# Altium PCB MB_v3.PcbDoc (part 10 of 11)
Units mm, origin at the board's own origin, x right, y up, seen from the top; angles counter-clockwise.
Board outline 203 x 72 mm, 6 copper layers (Top Layer, Layer 3, Layer 1, Layer 2, Layer 4, Bottom Layer), stack 1.52 mm thick; 726 components, 608 nets, 3144 pads, 2508 vias.
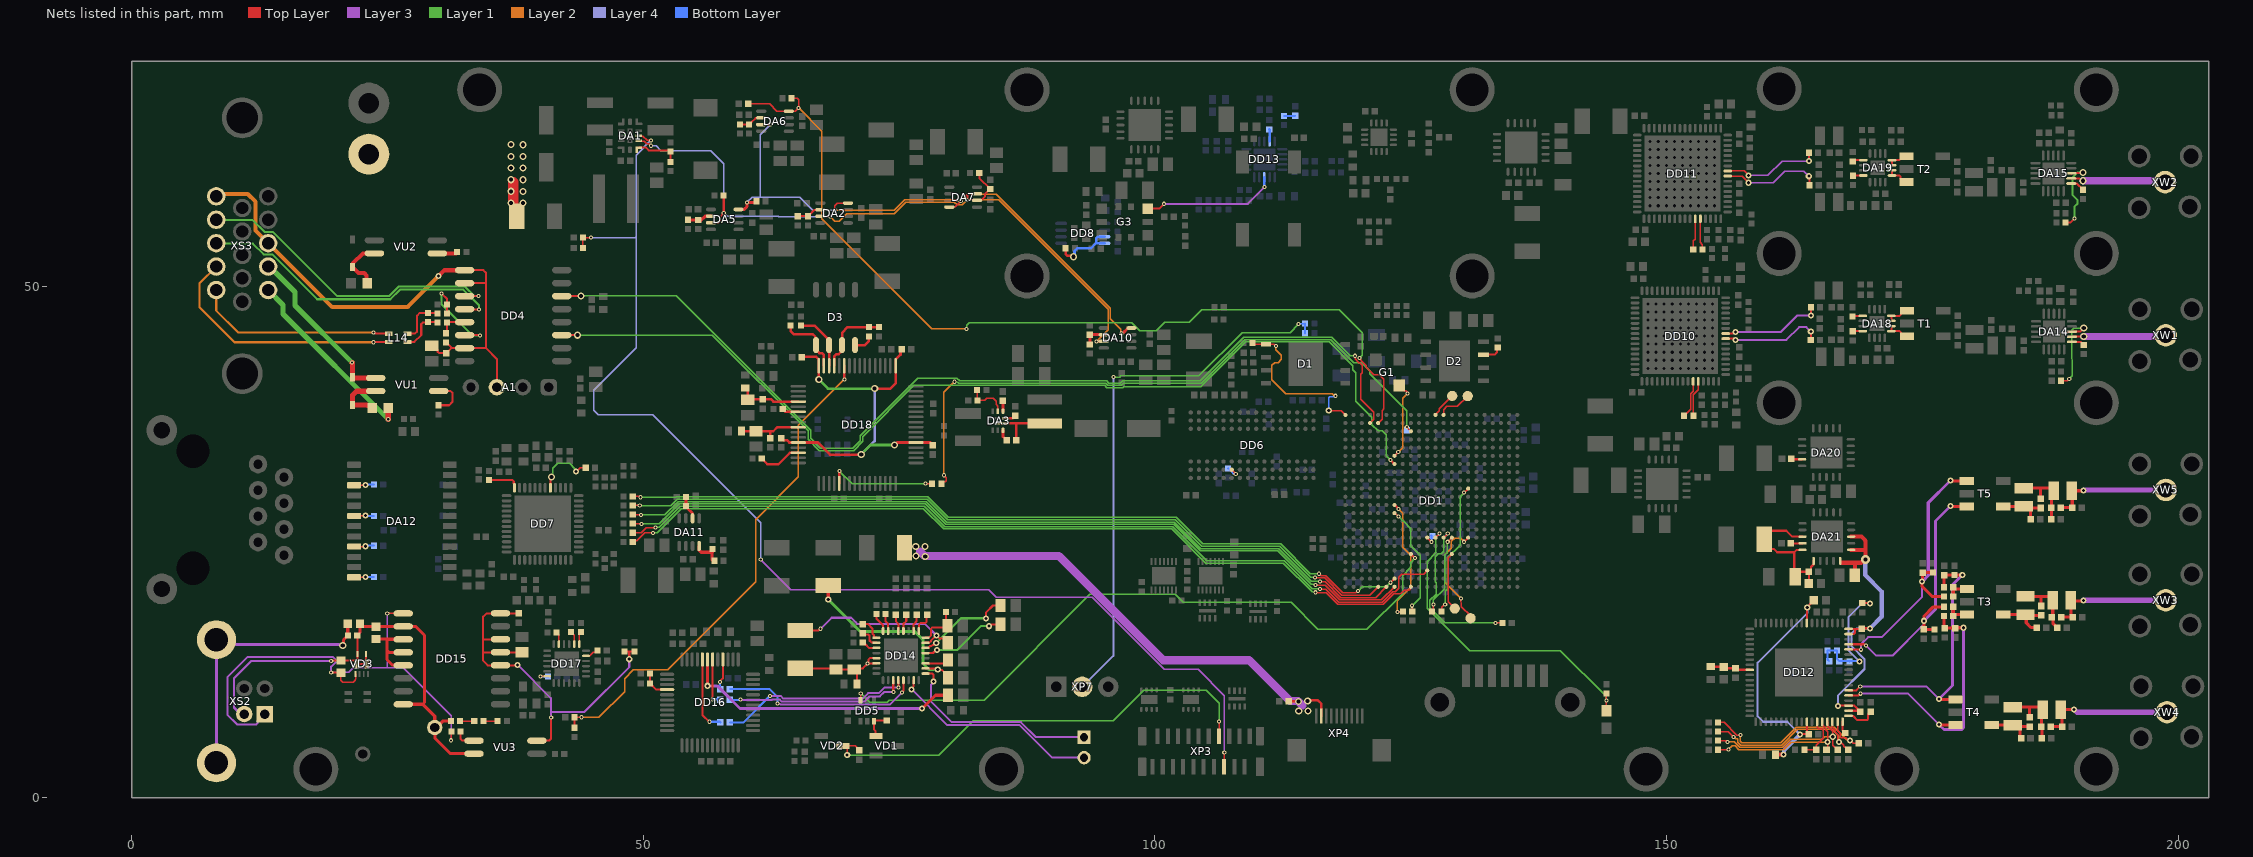
[diagram p12: the nets of this part, all layers, seen from the top]

## Via types
v1: diameter 0.8, hole 0.4, Top Layer to Bottom Layer, tented both sides, 1056 vias
v2: diameter 0.4, hole 0.2, Top Layer to Bottom Layer, tented both sides, 707 vias
v3: diameter 0.6, hole 0.3, Top Layer to Bottom Layer, tented both sides, 364 vias
v4: diameter 0.7, hole 0.4, Top Layer to Bottom Layer, tented both sides, 223 vias
v5: diameter 0.8, hole 0.4, Top Layer to Bottom Layer, 52 vias
v6: diameter 0.9, hole 0.5, Top Layer to Bottom Layer, 45 vias
v7: diameter 0.66, hole 0.4, Top Layer to Bottom Layer, 25 vias
v8: diameter 0.7, hole 0.3, Top Layer to Bottom Layer, 13 vias
v9: diameter 0.5, hole 0.2, Top Layer to Bottom Layer, 12 vias
v10: diameter 0.5, hole 0.3, Top Layer to Bottom Layer, 5 vias
v11: diameter 1, hole 0.5, Top Layer to Bottom Layer, 2 vias
v12: diameter 0.4, hole 0.2, Top Layer to Bottom Layer, 2 vias
v13: diameter 0.9, hole 0.4, Top Layer to Bottom Layer, tented both sides, 2 vias

## Nets (pads, with @x,y where several pads share a name; then routed paths per layer and width w, separated by ;. In a path a pad name is that pad's centre, name@x,y a point inside that pad or via, vN(x,y) a via of type N, cw(c..) or ccw(c..) an arc to the next point about the centre after c; other vN are vias at no path point) (continued)
NetC273_2: C273.2 C275.2 R137.1 R138.1 R144.1 R145.1 | length 13.3
  Top Layer w0.2: R145.1@169.125,19.025 169.825,19.025 v3@169.85,19.05
  Layer 4 w0.2: v3(168.839,13.336) 167.785,14.39 167.785,17.685 169.125,19.025 169.844,19.025 v3(169.864,19.004)
  Bottom Layer w0.2: C273.2@165.878,13.367 165.725,13.521 R138.1@165.725,14.4 R137.1@166.65,14.4 166.65,13.605 C275.2@166.887,13.367 167.843,13.367 R144.1@167.878,13.332 167.921,13.375 v3@168.8,13.375
NetC274_2: C274.2 C276.2 DD12.8 DD12.47 L46.2 | length 25.6
  Top Layer w0.2: v3@163.002,6.223 C276.2@163.896,6.223 163.71,6.409 DD12.47@163.71,7.434 ; DD12.8@163.71,17.084 163.71,18.623 164.066,18.979 164.091,18.979 164.391,19.279 C274.2@164.391,19.329
  Top Layer w0.4: L46.2@160.635,4.225 v3(161.43,4.225)
  Layer 4 w0.2: v3(163.039,6.186) 161.791,7.434 159.441,7.434 158.9,7.975 158.9,13.2 163.749,18.049 v3(163.749,18.584)
  Layer 4 w0.4: v3(161.43,4.225) 161.468,4.263 161.468,4.615 v3(163.039,6.186)
NetC277_2: C277.2 DD12.49 R143.2 | length 4.6
  Top Layer w0.125: R143.2@163.467,4.699 163.469,4.697 C277.2@164.61,4.697 164.629,4.716 164.629,5.131 165.324,5.825 165.324,6.621 165.213,6.731 164.864,6.731 164.71,6.885 DD12.49@164.71,7.434
NetC278_2: C278.2 DA20.14 | length 1.1
  Top Layer w0.2: C278.2@162.197,33.147 162.255,33.089 DA20.14@163.251,33.089
NetC279_2: C279.2 DD12.50 R142.2 | length 14.3
  Top Layer w0.125: R142.2@155.027,4.699 156.024,4.699 v2(156.05,4.725) ; DD12.50@165.21,7.434 165.21,7.134 165.574,6.77 165.574,6.656 165.749,6.481 165.749,5.448 v3(165.741,5.44) 165.741,4.812 C279.2@165.626,4.697
  Layer 2 w0.125: v2(156.05,4.725) 156.4,5.075 156.695,5.075 157.071,4.7 161.434,4.7 162.174,5.44 v3(165.741,5.44)
NetC281_2: C281.2 DD12.51 R141.2 | length 15.1
  Top Layer w0.125: R141.2@155.027,5.588 155.763,5.588 155.876,5.475 v2(155.95,5.475) ; DD12.51@165.71,7.434 165.734,7.41 165.734,7.004 166.237,6.501 v3(166.237,5.969) 166.261,5.945 166.261,5.159 C281.2@166.723,4.697
  Layer 2 w0.125: v2(155.95,5.475) 156.614,5.475 157.164,4.925 161.341,4.925 162.139,5.723 165.222,5.723 165.467,5.969 v3(166.237,5.969)
NetC283_2: C283.2 DD12.52 R140.2 | length 17.5
  Top Layer w0.125: R140.2@155.027,6.477 156.01,6.477 v2(156.531,5.956) ; DD12.52@166.21,7.434 166.21,6.882 166.487,6.605 166.487,6.408 166.724,6.171 166.724,5.753 166.747,5.73 166.747,5.624 167.019,5.351 167.128,5.351 167.333,5.146 167.333,5.028 167.406,4.955 167.482,4.955 C283.2@167.739,4.697
  Layer 2 w0.125: v2(156.531,5.956) 156.606,5.956 156.778,5.784 156.891,5.784 156.964,5.711 156.964,5.443 157.257,5.15 161.247,5.15 162.782,6.684 166.176,6.684 166.838,6.022 v3(166.838,5.442)
NetC284_2: C284.2 C288.2 C291.2 DA21.13 DA21.15 DA21.16 L47.2 | length 15.4
  Top Layer w0.2: DA21.15@163.289,24.227 162.702,24.227 162.475,24 ; DA21.13@163.289,25.527 162.273,25.527 161.7,26.1 160.18,26.1 159.53,25.45 159.53,24.99 160.18,24.34 160.463,24.34 160.803,24 162.475,24 ; C288.2@163.9,20.95 163.913,20.963 C291.2@163.913,22.093 ; DA21.16@164.364,23.152 164.354,23.142 164.354,22.804 164.11,22.56 164.11,22.29 C291.2@163.913,22.093 ; 162.475,24 162.475,21.7 C284.2@162.575,21.6 162.575,21.618 163.05,22.093 C291.2@163.913,22.093
NetC286_2: C286.2 C289.2 DD12.27 L48.2 | length 3.9
  Top Layer w0.25: L48.2@154.323,12.822 154.353,12.792 C286.2@155.593,12.792 155.733,12.652 C289.2@156.736,12.652 156.879,12.509 DD12.27@158.135,12.509
NetC287_2: C287.2 DD12.53 R139.2 | length 18.9
  Top Layer w0.125: R139.2@155.027,7.366 155.634,7.366 156.875,6.125 v2(157.225,6.125) ; DD12.53@166.71,7.434 166.71,6.82 166.737,6.793 166.737,6.536 166.974,6.298 166.974,5.972 167.084,5.862 167.509,5.862 167.783,5.588 167.969,5.588 168.223,5.334 C287.2@168.77,5.334
  Layer 2 w0.125: v2(157.225,6.125) 157.189,6.089 157.189,5.536 157.35,5.375 161.154,5.375 162.688,6.909 166.364,6.909 167.594,5.679 167.821,5.679 v3(167.912,5.588)
NetC290_2: C290.2 DD12.55 | length 2.9
  Top Layer w0.2: DD12.55@167.785,8.009 167.795,7.999 168.251,7.999 168.65,7.6 169.583,7.6 169.7,7.717 169.7,8.093 169.724,8.117 169.724,8.21 C290.2@169.944,8.43
NetC292_2: C292.2 DA21.14 | length 1.1
  Top Layer w0.2: C292.2@162.149,24.892 162.164,24.877 DA21.14@163.289,24.877
NetC293_2: C293.2 C294.2 C295.2 DA21.1 DA21.3 DA21.20 DD12.56 DD12.57 DD12.71 DD12.72 | length 34.1
  Top Layer w0.2: v3@166.741,9.009 DD12.57@167.785,9.009 168.346,9.009 168.525,8.83 168.528,8.83 C295.2@168.849,8.509 ; DA21.20@166.964,23.152 166.964,22.998 166.987,22.975 DA21.20@167.039,22.975 ; DD12.56@167.785,8.509 C295.2@168.849,8.509 ; DD12.71@167.785,16.009 DD12.71@167.785,16.009 168.285,16.01 168.404,16.129 168.404,16.509 ; DD12.72@167.785,16.509 168.404,16.509 ; C295.2@168.928,8.43 C295.2@168.849,8.509 ; v3@169.825,16.575 169.089,16.575 C294.2@169.055,16.541 169.023,16.509 168.404,16.509
  Top Layer w0.4: DA21.20@167.039,22.975 168.25,22.975 ; DA21.1@168.039,24.227 169.45,24.227 ; DA21.3@168.039,25.527 169.048,25.527 169.249,25.325 169.45,25.125 169.45,24.227 ; C293.2@168.4,21.75 168.4,22.825 168.25,22.975 ; 168.25,22.975 168.99,22.975 169.315,23.3 v13(169.45,23.3) 169.45,24.227
  Layer 4 w0.2: v3(166.764,8.986) 166.764,10.014 169.339,12.589 169.339,13.543 168.085,14.797 168.085,16.06 168.561,16.536 v3(169.864,16.536)
  Layer 4 w0.4: v13(169.45,23.3) 169.414,23.264 169.414,21.786 171.025,20.175 171.025,17.697 v3(169.864,16.536)
NetC296_2: C296.2 DD12.68 R147.1 R157.2 T5.3 | length 28.8
  Top Layer w0.2: DD12.68@167.785,14.509 168.966,14.509 v2(169,14.475)
  Top Layer w0.3: R147.1@176.04,22.029 176.03,22.019 C296.2@175.024,22.019 175.024,21.174 v3(174.975,21.125) 174.975,20.65 175.94,19.685 R157.2@177.114,19.685 ; v3@177.7,30.975 177.707,30.968 T5.3@179.35,30.968
  Layer 3 w0.2: v2(169,14.475) 169,14.991 169.709,15.7 171.025,15.7 174.975,19.65 v3(174.975,21.125)
  Layer 3 w0.3: v3(174.975,21.125) 175.575,21.725 175.575,28.85 v3(177.741,31.016)
NetC298_2: C298.2 DD12.69 R148.1 R153.2 T5.1 | length 28
  Top Layer w0.2: DD12.69@167.785,15.009 169.312,15.009 169.421,14.9 v2(169.475,14.9)
  Top Layer w0.3: R148.1@176.167,16.452 175.161,16.452 C298.2@175.151,16.462 v3(175.15,17.3) v3(175.15,17.3) 175.155,17.305 175.155,17.755 176.069,18.669 R153.2@177.114,18.669 ; v3@177.707,28.468 T5.1@179.35,28.468
  Layer 3 w0.2: v2(169.475,14.9) 170.475,13.9 172.075,13.9 175.088,16.913 175.088,17.238 v3(175.15,17.3)
  Layer 3 w0.3: v3(175.15,17.3) 176.275,18.425 176.275,27.05 v3(177.741,28.516)
NetC300_1: C300.1 DA3.1 | length 1
  Top Layer w0.25: C300.1@85.125,38.79 85.15,38.765 DA3.1@85.15,37.775
NetC301_2: C301.2 DD12.60 R149.1 R154.2 T4.3 | length 27.2
  Top Layer w0.2: DD12.60@167.785,10.509 168.534,10.509 v2(168.925,10.9)
  Top Layer w0.3: v3@176.597,9.606 T4.3@178.24,9.606 ; R154.2@177.114,20.574 177.114,21.742 C301.2@177.137,21.765 177.147,21.775 R149.1@178.153,21.775 v3(178.9,21.775)
  Layer 3 w0.2: v2(168.925,10.9) 175.385,10.9 v3(176.631,9.654)
  Layer 3 w0.3: v3(176.631,9.654) 177.95,10.973 177.95,20.825 v3(178.9,21.775)
NetC302_1: C302.1 DA3.9 | length 1.1
  Top Layer w0.25: DA3.9@85.325,37.1 86.11,37.1 C302.1@86.35,37.34
NetC303_2: C303.2 DD12.59 R150.1 R152.2 T4.1 | length 27.3
  Top Layer w0.2: DD12.59@167.785,10.009 168.733,10.009 168.899,10.175 v2(168.95,10.175)
  Top Layer w0.3: v3@176.597,7.106 T4.1@178.24,7.106 ; R152.2@177.114,17.78 177.114,16.648 R150.1@177.183,16.579 178.189,16.579 C303.2@178.199,16.589 178.235,16.625 v3(179.025,16.625)
  Layer 3 w0.2: v2(168.95,10.175) 173.61,10.175 v3(176.631,7.154)
  Layer 3 w0.3: v3(176.631,7.154) 177.102,6.683 178.849,6.683 179.025,6.859 v3(179.025,16.625)
NetC304_1: C304.1 DA3.7 | length 1.2
  Top Layer w0.25: DA3.7@85.15,35.925 85.15,35.29 C304.1@85.515,34.925
NetC304_2: C304.2 DA3.8 L67.1 | length 6
  Top Layer w0.25: DA3.8@84.95,36.6 86.45,36.6 ; C304.2@86.435,34.925 86.45,34.94 86.45,36.6 ; L67.1@89.225,36.565 89.19,36.6 86.45,36.6
NetC306_2: C306.2 C307.2 L50.1 T3.5 | length 5.6
  Top Layer w0.3: T3.5@182.898,17.907 L50.1@185.072,17.907 ; C306.2@186.184,16.637 186.171,16.65 185.6,16.65 185.151,17.099 185.151,17.828 C307.2@186.596,17.828
NetC307_1: C307.1 C314.2 C315.2 L50.2 L53.1 | length 6.7
  Top Layer w0.3: L50.2@185.072,19.687 186.65,19.687 ; C307.1@186.596,18.748 186.596,19.633 186.65,19.687 ; C314.2@188.168,16.637 187.744,17.061 187.744,17.569 C315.2@187.66,17.653 187.738,17.731 L53.1@187.738,19.304 187.738,19.327 187.378,19.687 186.65,19.687
NetC308_2: C308.2 C312.2 L51.1 T4.5 | length 4.8
  Top Layer w0.3: T4.5@181.78,7.106 183.814,7.106 L51.1@183.835,7.085 ; L51.1@184.193,6.959 C312.2@185.486,6.959 ; L51.1@184.193,7.085 184.553,6.725 184.553,5.908 C308.2@184.645,5.816
NetC309_2: C309.2 C313.2 L52.1 T5.5 | length 5.5
  Top Layer w0.3: T5.5@182.89,28.468 184.882,28.468 L52.1@184.899,28.485 ; C309.2@185.582,27.215 185.582,28.125 185.222,28.485 L52.1@184.899,28.485 ; C313.2@186.55,28.327 185.057,28.327 L52.1@184.899,28.485
NetC311_2: C311.2 L68.2 XP4.2 | length 47.3
  Top Layer w0.25: C311.2@113.085,9.425 v4(114.025,9.425) ; v4(114.925,9.45) 115,9.525 115.926,9.525 116.25,9.201 XP4.2@116.25,8
  Layer 3 w0.8: 77.037,24.088 77.48,23.645 90.605,23.645 100.8,13.45 109.2,13.45 113.188,9.462 113.987,9.462 114.425,9.025
  other v4: 114.95,8.475 114.05,8.5 77.55,23.6 76.65,23.625 76.625,24.55 77.525,24.575
NetC312_1: C312.1 C316.2 C318.2 L51.2 L54.1 | length 6.8
  Top Layer w0.3: L51.2@183.835,8.865 185.475,8.865 ; C312.1@185.486,7.879 185.486,8.854 185.475,8.865 ; C316.2@186.677,5.816 186.677,6.911 C318.2@186.629,6.959 186.629,8.736 186.5,8.865 185.475,8.865
NetC313_1: C313.1 C317.2 C319.2 L52.2 L55.1 | length 7
  Top Layer w0.3: L52.2@184.899,30.265 186.475,30.265 ; C313.1@186.55,29.247 186.55,30.19 186.475,30.265 ; C317.2@187.614,27.215 C319.2@187.614,28.358 187.614,29.803 L55.1@187.82,30.009 187.564,30.265 186.475,30.265
NetC315_1: C315.1 C320.2 L53.2 XW3.1 | length 12
  Top Layer w0.3: C315.1@188.58,17.653 C320.2@189.692,17.653 189.518,17.827 L53.2@189.518,19.304 ; L53.2@189.587,19.227 v3@190.696,19.227
  Layer 3 w0.5: v3@190.773,19.304 XW3.1@198.78,19.304
  other v3: 190.737,19.268
NetC318_1: C318.1 C321.2 L54.2 XW4.1 | length 13.3
  Top Layer w0.3: C318.1@187.549,6.959 C321.2@188.661,6.959 L54.2@188.661,8.292 ; L54.2@188.535,8.292 188.893,8.65 v3(189.8,8.65) ; L54.2@188.535,8.61 L54.2@188.661,8.484
  Layer 3 w0.5: v3(189.8,8.65) 189.827,8.65 190.108,8.369 XW4.1@198.905,8.369
NetC319_1: C319.1 C322.2 L55.2 XW5.1 | length 12
  Top Layer w0.3: C319.1@188.534,28.358 C322.2@189.646,28.358 189.646,29.963 L55.2@189.6,30.009 190.709,30.009 v3(190.75,30.05)
  Layer 3 w0.3: v3(190.75,30.05) v3@190.786,30.086
  Layer 3 w0.5: v3@190.786,30.086 XW5.1@198.793,30.086
NetC324_1: C324.1 R197.1 | length 1.1
  Bottom Layer w0.2: R197.1@112.6,66.65 C324.1@113.7,66.65
NetC325_2: C325.2 C338.1 DD18.4 L70.1 | length 6.4
  Top Layer w0.25: L70.1@59.95,40.07 59.98,40.07 60.2,39.85 C338.1@60.2,38.9 60.26,38.96 C325.2@61.65,38.96 62.49,38.96 62.725,38.725 DD18.4@65.15,38.725
NetC326_1: C326.1 C328.2 C329.2 C330.2 DD18.12 DD18.37 DD18.49 DD18.64 | length 38.5
  Top Layer w0.25: C330.2@63.5,35.16 63.695,34.965 64.035,34.965 64.275,34.725 DD18.12@65.15,34.725 67.066,34.725 68.241,33.55 v4@71.3,33.55 ; C329.2@65.485,43.05 65.535,43.1 66.9,43.1 67.15,42.85 DD18.64@67.15,42.225 v4(67.15,40.875) ; v4@72.6,40 74.15,40 74.65,40.5 DD18.49@74.65,42.225 74.65,42.85 74.664,42.85 75.134,43.32 75.134,43.709 C328.2@75.275,43.85 ; v4@74.55,34.475 74.8,34.725 DD18.37@76.65,34.725 78.05,34.725 C326.1@78.3,34.475
  Layer 1 w0.25: v4(67.15,40.875) 68.034,39.991 v4(72.612,39.991) ; v4(71.295,33.551) 72.223,34.479 v4(74.547,34.479)
  Layer 4 w0.25: v4(71.295,33.551) 72.612,34.868 v4(72.612,39.991)
NetC327_2: C327.2 C346.2 DD15.12 DD15.13 DD15.14 DD15.16 R170.1 R172.1 VU3.4 | length 39
  Top Layer w0.2: DD15.14@36.043,15.494 34.35,15.494 ; v3@37.725,12.975 37.704,12.954 DD15.12@36.043,12.954 34.796,12.954 34.35,13.4 34.35,14.175 ; C346.2@37.825,18.02 37.811,18.034 DD15.16@36.043,18.034 34.684,18.034 34.35,17.7 34.35,15.494 ; C327.2@38.15,14.225 38.149,14.224 DD15.13@36.043,14.224 34.399,14.224 34.35,14.175 ; VU3.4@39.6,5.585 40.785,5.585 41,5.8 v2(41,7.85) ; R172.1@48.15,14.3 48.65,14.3 ; v3(48.625,13.55) 48.625,14.275 48.65,14.3 ; R170.1@49.15,14.3 48.65,14.3 ; 34.35,14.175 34.35,15.494
  Layer 3 w0.2: v3(37.71,12.99) 40.95,9.75 ; v2(41,7.85) 41,8.4 ; 41,9.75 41,8.4 ; v3(48.625,13.55) 48.625,12.775 44.25,8.4 41,8.4
NetC331_1: C331.1 DD16.30 | length 4.7
  Top Layer w0.2: v2@56.775,9.625 DD16.30@56.775,13.525
  Bottom Layer w0.2: v2(56.775,9.636) 57.479,9.636 C331.1@57.54,9.575
NetC331_2: C331.2 DD14.19 | length 17.7
  Top Layer w0.2: DD14.19@74.425,11.5 74.425,10.35 v2(74.45,10.325)
  Layer 3 w0.2: v2(59.506,9.593) 59.538,9.561 62.541,9.561 62.58,9.6 63.351,9.6 63.551,9.4 71.575,9.4 72.1,9.925 73.124,9.925 73.524,10.325 v2(74.45,10.325)
  Bottom Layer w0.2: C331.2@58.46,9.575 59.525,9.575 v2@59.55,9.55
NetC332_1: C332.1 DD16.32 | length 7.5
  Top Layer w0.2: DD16.32@55.775,13.525 55.775,8.1 v2@56.45,7.425
  Bottom Layer w0.2: v2(56.45,7.436) 57.479,7.436 C332.1@57.54,7.375
NetC332_2: C332.2 DD14.20 | length 18.8
  Top Layer w0.2: v2(74.925,10.8) DD14.20@74.925,11.5
  Layer 3 w0.2: v2(62.375,9.961) 63.414,9.961 63.675,9.7 71.451,9.7 71.976,10.225 73,10.225 73.575,10.8 v2(74.925,10.8)
  Bottom Layer w0.2: C332.2@58.46,7.375 59.8,7.375 v2@62.375,9.95
NetC333_2: C333.2 C337.1 DD18.9 L69.1 | length 6.4
  Top Layer w0.25: L69.1@59.6,35.85 59.625,35.825 C337.1@61.02,35.825 62.375,35.825 ; C333.2@62.425,35.16 62.425,35.775 62.375,35.825 ; DD18.9@65.15,36.225 63.1,36.225 62.7,35.825 62.375,35.825
NetC334_1: C334.1 DD16.28 | length 3.1
  Top Layer w0.2: v2(57.475,11.325) 57.475,11.379 57.775,11.679 DD16.28@57.775,13.525
  Bottom Layer w0.2: v2(57.475,11.325) 57.475,10.69 C334.1@57.54,10.625
NetC334_2: C334.2 DD14.21 | length 19.6
  Top Layer w0.2: v2(75.3,10.3) 75.3,10.354 75.425,10.479 DD14.21@75.425,11.5
  Layer 3 w0.2: v2(63.1,9.2) 63.138,9.162 63.365,9.162 63.426,9.1 74.1,9.1 v2(75.3,10.3)
  Bottom Layer w0.2: C334.2@58.46,10.625 62.35,10.625 63.1,9.875 v2(63.1,9.2)
NetC341_2: C341.2 DD14.1 | length 2.2
  Top Layer w0.2: DD14.1@76.925,16.3 76.925,16.9 77.125,17.1 77.573,17.1 77.69,17.217 77.69,17.867 C341.2@77.728,17.905
NetC342_2: C342.2 DD14.2 | length 1.7
  Top Layer w0.2: DD14.2@76.425,16.3 76.425,16.975 76.702,17.252 C342.2@76.702,17.895
NetC344_2: C344.2 DD14.4 | length 1.7
  Top Layer w0.2: DD14.4@75.425,16.3 75.425,17 75.696,17.271 C344.2@75.696,17.905
NetC345_2: C345.2 DD14.5 | length 1.7
  Top Layer w0.2: C345.2@74.68,17.905 74.675,17.9 74.675,17.25 74.925,17 DD14.5@74.925,16.3
NetC347_1: C347.1 C348.1 DD14.13 DD14.14 L60.2 L61.1 | length 10.4
  Top Layer w0.2: L61.1@65.35,12.65 68.723,12.65 C348.1@68.838,12.535 C347.1@70.616,12.535 ; L60.2@70.865,11.126 70.865,12.514 70.73,12.649 71.449,12.649 v2(71.925,13.125) ; DD14.14@72.775,13.15 71.95,13.15 v2(71.925,13.125) ; DD14.13@72.775,13.65 72.142,13.65 72.025,13.533 72.025,13.279 71.925,13.179 v2(71.925,13.125)
NetC349_1: C349.1 C352.1 C357.2 C358.1 DD15.2 DD15.8 R175.2 R178.2 VD3.5 VU3.2 XS2.4 | length 48.8
  Top Layer w0.2: v2(19.5,13.375) 19.554,13.375 19.606,13.427 C358.1@20.447,13.427 21.658,13.427 21.684,13.401 21.879,13.401 22.004,13.276 VD3.5@22.004,13.081 ; R178.2@22.04,15.875 22.079,15.836 VD3.5@22.079,14.056 22.079,13.156 VD3.5@22.004,13.081 ; VD3.5@22.879,14.056 22.879,13.156 VD3.5@22.954,13.081 VD3.5@22.004,13.081
  Top Layer w0.3: R178.2@22.04,15.875 22.317,16.152 C357.2@22.317,17.018 ; C357.2@22.317,16.993 22.567,16.743 22.725,16.743 22.743,16.725 C349.1@23.875,16.725 26.504,16.725 DD15.2@26.543,16.764 27.736,16.764 28.623,15.877 28.623,9.32 28.447,9.144 ; DD15.8@26.543,9.144 28.447,9.144 ; R175.2@31.189,7.5 30.393,7.5 29.768,6.875 C352.1@29.617,6.875 ; VU3.2@33.45,4.315 31.16,4.315 29.624,5.851 29.624,6.868 C352.1@29.617,6.875 ; 28.447,9.144 29.617,7.974 C352.1@29.617,6.875
  Layer 3 w0.2: XS2.4@10.997,8.183 10.642,8.183 9.997,8.828 9.997,11.697 11.675,13.375 v2(19.5,13.375)
NetC349_2: C349.2 DD15.3 DD15.4 DD15.5 | length 8.2
  Top Layer w0.3: C349.2@23.875,15.525 24.95,15.525 ; DD15.5@26.543,12.954 26.511,12.986 25.464,12.986 24.95,13.5 24.95,14.412 ; DD15.4@26.543,14.224 25.138,14.224 24.95,14.412 ; DD15.3@26.543,15.494 26.537,15.5 25.126,15.5 25.101,15.525 24.95,15.525 ; 24.95,14.412 24.95,15.525
NetC350_1: C350.1 DD14.27 | length 2.3
  Top Layer w0.2: DD14.27@77.575,13.15 79.458,13.15 C350.1@79.769,13.462
NetC351_1: C351.1 DD14.32 R171.1 | length 4.4
  Top Layer w0.2: DD14.32@77.575,15.65 77.585,15.66 77.91,15.66 78.1,15.85 78.1,16.508 78.217,16.625 79.525,16.625 C351.1@79.725,16.825 79.575,16.975 R171.1@79.575,18.175
NetC353_1: C353.1 DD14.31 L61.2 | length 17.1
  Top Layer w0.2: L61.2@65.35,16.35 67.108,16.35 67.283,16.525 v2(67.325,16.525) ; DD14.31@77.575,15.15 77.585,15.16 77.962,15.16 78.107,15.304 78.107,15.356 78.614,15.864 v3(78.65,15.864) ; v3@78.65,15.85 78.669,15.85 78.968,15.551 79.538,15.551 C353.1@79.645,15.444
  Layer 3 w0.2: v2(67.325,16.525) 68.4,17.6 70.305,17.6 70.905,17 77.514,17 v3(78.65,15.864)
NetC354_1: C354.1 DD14.26 L62.2 | length 18.4
  Top Layer w0.2: DD14.26@77.575,12.65 78.567,12.65 78.667,12.55 v3(78.775,12.55) 78.852,12.473 79.202,12.473 79.506,12.169 C354.1@79.506,12.13
  Top Layer w0.3: v3(68.075,19.375) L62.2@68.075,20.75
  Layer 1 w0.3: v3(68.075,19.375) 71.175,16.275 76.5,16.275 77.325,15.45 77.325,13.125 77.9,12.55 v3(78.775,12.55)
NetC355_2: C355.2 DD14.29 | length 8.5
  Top Layer w0.2: DD14.29@77.575,14.15 78.308,14.15 78.591,14.434 v3(78.7,14.434) ; v3(83.775,16.775) 83.883,16.775 84.058,16.95 C355.2@84.9,16.95
  Layer 1 w0.2: v3(78.7,14.434) 80.659,14.434 83.025,16.8 83.75,16.8 v3(83.775,16.775)
NetC356_2: C356.2 DD14.30 | length 9.4
  Top Layer w0.2: DD14.30@77.575,14.65 77.864,14.65 78.048,14.835 78.154,14.835 78.269,14.949 78.335,14.949 78.521,15.135 v3(78.629,15.135) ; v3(83.475,17.525) 83.5,17.55 83.5,18.125 84.175,18.8 C356.2@84.9,18.8
  Layer 1 w0.2: v3(78.629,15.135) 81.044,17.55 83.45,17.55 v3(83.475,17.525)
NetC357_1: C357.1 R178.1 XS2.5 | length 26.9
  Top Layer w0.3: v4(20.625,14.9) 20.702,14.977 20.702,15.437 R178.1@21.14,15.875 21.117,15.898 C357.1@21.117,17.018
  Layer 3 w0.3: XS2.5@8.287,3.413 XS2.5@8.287,15.453 8.763,14.977 20.548,14.977 v4(20.625,14.9)
NetC358_2: C358.2 DD15.1 R169.1 VD3.1 XS2.1 | length 49
  Top Layer w0.125: C358.2@20.447,12.227 20.447,11.478 20.625,11.3 21.675,11.3 21.866,11.491 21.866,11.575 21.879,11.588 VD3.1@21.879,12.106 ; v2(24.975,18.025) 24.984,18.034 DD15.1@26.543,18.034 ; v2(31.225,5.625) 31.25,5.65 R169.1@31.25,6.475
  Top Layer w0.2: v2(19.5,12.25) 19.523,12.227 C358.2@20.447,12.227
  Layer 3 w0.125: v2(19.5,12.25) 21.225,12.25 21.673,12.698 24.975,12.698 ; v2(24.975,18.025) 24.975,12.698 ; v2(31.225,5.625) 31.225,8.025 26.552,12.698 24.975,12.698
  Layer 3 w0.2: XS2.1@12.997,8.183 12.297,7.483 12.297,7.3 12.18,7.183 10.292,7.183 9.35,8.125 9.35,11.775 11.35,13.775 19.666,13.775 19.9,13.541 19.9,13.209 19.5,12.809 v2(19.5,12.25)
NetC362_1: C362.1 DD16.31 | length 27.5
  Top Layer w0.3: v3(56.275,10.95) DD16.31@56.275,13.525 ; v3(77.25,8.725) 78.55,10.025 C362.1@79.775,10.025
  Layer 3 w0.3: v3(56.275,10.95) 57.215,10.95 59.44,8.725 v3(77.25,8.725)
NetD1_1: D1.1 DD1.A1 R22.1 | length 17.2
  Top Layer w0.125: R22.1@109.55,44.45 109.685,44.315 D1.1@110.86,44.315 111.611,44.315 111.751,44.175 v2(111.825,44.175) ; v3(116.985,37.846) 118.191,37.846 DD1.A1@118.612,37.425
  Layer 2 w0.125: v2(111.825,44.175) 111.825,43.779 112.363,43.242 112.363,42.858 112.042,42.538 111.706,42.538 111.425,42.257 111.425,40.85 112.775,39.5 117.319,39.5 117.527,39.291 v2(117.63,39.291)
  Bottom Layer w0.125: v3(116.985,37.846) 116.985,39.116 117.08,39.211 117.549,39.211 v2(117.63,39.291)
NetD2_3: D2.3 R26.2 | length 1.9
  Top Layer w0.2: D2.3@132.098,43.307 133.207,43.307 133.417,43.517 133.417,43.922 R26.2@133.495,44
NetD3_1: D3.1 DD18.63 R202.1 | length 6.5
  Top Layer w0.25: R202.1@64.375,46.15 64.396,46.129 64.396,45.621 64.716,45.301 66.572,45.301 66.813,45.06 66.813,44.317 D3.1@66.88,44.25 66.88,43.773 67.201,43.452 67.473,43.452 67.65,43.275 DD18.63@67.65,42.225
NetD3_2: D3.2 DD18.62 R200.1 | length 5.8
  Top Layer w0.25: R200.1@65.4,46.15 66.725,46.15 68.15,44.725 D3.2@68.15,44.25 DD18.62@68.15,42.225
NetD3_3: D3.3 DD18.61 R198.2 R199.1 | length 7.5
  Top Layer w0.25: DD18.61@68.65,42.225 68.65,43.14 68.864,43.354 69.099,43.354 69.353,43.609 69.353,44.183 D3.3@69.42,44.25 69.42,45.445 69.975,46 R198.2@72.05,46 R199.1@73.05,46
NetD3_4: D3.4 R198.1 | length 2
  Top Layer w0.25: D3.4@70.69,44.25 71.65,44.25 72.05,44.65 R198.1@72.05,45.1
NetDA1_7: DA1.7 R189.1 R190.2 | length 4.2
  Top Layer w0.2: DA1.7@49.57,63.545 50.269,63.545 50.53,63.283 52.517,63.283 R189.1@52.65,63.15 R190.2@52.65,62.15
NetDA2_6: DA2.6 R7.1 R8.1 | length 2.5
  Top Layer w0.2: R8.1@65.094,56.839 R7.1@66.11,56.839 66.725,57.454 67.278,57.454 DA2.6@67.3,57.476
NetDA3_2: DA3.2 R4.2 R9.1 | length 4.1
  Top Layer w0.125: R4.2@82.625,39.85 82.65,39.825 R9.1@82.65,38.825 82.675,38.85 83.371,38.85 83.558,39.038 84.214,39.038 84.475,38.777 84.475,38.45 84.65,38.275 DA3.2@84.65,37.775
NetDA5_6: DA5.6 R13.1 R14.1 | length 2.2
  Top Layer w0.3: R14.1@54.479,56.487 R13.1@55.368,56.487 ; R13.1@55.531,56.325 56.045,56.839 56.598,56.839 DA5.6@56.608,56.849
NetDA6_6: DA6.6 R15.1 R16.1 | length 2.3
  Top Layer w0.2: R16.1@59.441,65.81 R15.1@60.33,65.81 60.53,66.01 60.56,66.01 60.968,66.418 61.491,66.418 DA6.6@61.52,66.447
NetDA7_6: DA7.6 R17.1 R18.1 | length 3.9
  Top Layer w0.2: DA7.6@82.605,58.383 82.971,58.383 83.046,58.458 83.083,58.458 83.382,58.757 83.382,58.985 R18.1@83.902,59.505 82.838,60.569 82.838,61.042 R17.1@82.828,61.052
NetDA8_1: DA8.1 F1.2 VU1.4 | length 5.4
  Top Layer w0.5: F1.2@23.495,38.1 23.495,38.135 23.275,38.355 23.028,38.355 22.982,38.401 DA8.1@21.59,38.401 21.59,39.34 21.982,39.732 23.83,39.732 VU1.4@23.849,39.751
NetDA9_1: DA9.1 F3.2 VU2.4 | length 5.5
  Top Layer w0.4: F3.2@23.015,50.292 22.962,50.345 22.962,51.066 22.728,51.3 22.153,51.3 21.79,51.663 21.64,51.663 21.59,51.713 DA9.1@21.59,51.863 21.64,51.913 21.64,52.263 22.59,53.213 VU2.4@23.722,53.213
NetDA10_6: DA10.6 R50.1 R51.1 | length 2.3
  Top Layer w0.3: R50.1@93.634,44.319 R51.1@93.634,45.255 93.645,45.266 DA10.6@94.998,45.266
NetDA11_6: DA11.6 R63.1 R64.1 | length 2.3
  Top Layer w0.3: R64.1@54.171,29.395 R63.1@54.171,28.506 54.321,28.356 54.321,28.279 54.798,27.802 54.798,27.326 DA11.6@54.808,27.316
NetDA12_15: DA12.15 R82.1 | length 1.9
  Top Layer w0.125: DA12.15@21.741,30.551 v3@22.821,30.551
  Bottom Layer w0.2: v3(22.86,30.59) 22.877,30.607 R82.1@23.68,30.607
NetDA12_18: DA12.18 R84.1 | length 1.9
  Top Layer w0.125: DA12.18@21.741,27.551 v3@22.821,27.551
  Bottom Layer w0.2: v3(22.86,27.59) 22.891,27.559 R84.1@23.68,27.559
NetDA12_21: DA12.21 R85.1 | length 1.9
  Top Layer w0.125: DA12.21@21.741,24.551 v3@22.821,24.551
  Bottom Layer w0.2: v3(22.86,24.59) 22.908,24.638 R85.1@23.68,24.638
NetDA12_24: DA12.24 R86.1 | length 2
  Top Layer w0.125: DA12.24@21.741,21.551 22.821,21.551 v3(22.86,21.59)
  Bottom Layer w0.2: v3(22.86,21.59) R86.1@23.68,21.59
NetDA14_1: DA14.1 R96.2 | length 1.3
  Top Layer w0.2: DA14.1@189.609,44.565 190.464,44.565 R96.2@190.764,44.265
NetDA14_2: DA14.2 XW1.1 | length 9
  Top Layer w0.2: DA14.2@189.609,45.065 189.619,45.075 190.754,45.075 v4(190.764,45.085)
  Layer 3 w0.7: v4(190.764,45.085) XW1.1@198.645,45.085
NetDA14_3: DA14.3 R88.1 | length 8.3
  Top Layer w0.125: R88.1@188.547,40.767 189.139,40.767 189.322,40.95 v2(189.35,40.95)
  Top Layer w0.2: DA14.3@189.609,45.565 190.409,45.565 190.754,45.91 v4(190.764,45.91)
  Layer 1 w0.125: v2(189.35,40.95) 189.638,41.238 189.638,42.825 189.575,42.888 189.575,45.677 189.808,45.91 v4(190.764,45.91)
NetDA15_1: DA15.1 R97.2 | length 1.4
  Top Layer w0.2: DA15.1@189.546,60.035 189.555,60.026 190.106,60.026 R97.2@190.709,59.423
NetDA15_2: DA15.2 XW2.1 | length 9.3
  Top Layer w0.2: DA15.2@189.546,60.535 190.346,60.535 190.58,60.301 v4(190.709,60.301)
  Layer 3 w0.5: XW2.1@198.59,60.301 XW2.1@198.717,60.174
  Layer 3 w0.7: v4(190.709,60.301) XW2.1@198.59,60.301
NetDA15_3: DA15.3 R91.1 | length 7.8
  Top Layer w0.2: R91.1@189,56.237 189.487,56.237 v2(189.85,56.6) ; DA15.3@189.546,61.035 189.555,61.045 190.627,61.045 v4(190.709,61.126)
  Layer 1 w0.2: v2(189.85,56.6) 189.85,57.759 190.175,58.084 190.175,58.416 189.65,58.941 189.65,60.604 190.173,61.126 v4(190.709,61.126)
NetDA18_5: DA18.5 R110.1 | length 1
  Top Layer w0.2: R110.1@168.175,47.05 168.23,47.105 DA18.5@169.171,47.105
NetDA18_8: DA18.8 R109.1 | length 1
  Top Layer w0.2: R109.1@168.2,45.6 168.205,45.605 DA18.8@169.171,45.605
NetDA18_13: DA18.13 DA18.14 T1.1 | length 2.3
  Top Layer w0.2: DA18.14@171.971,46.105 DA18.13@171.971,45.605 172.783,45.605 172.9,45.488 172.9,45.385 173.18,45.105 T1.1@173.5,45.105
NetDA18_15: DA18.15 DA18.16 T1.3 | length 2.3
  Top Layer w0.2: DA18.15@171.971,46.605 DA18.16@171.971,47.105 172.783,47.105 172.9,47.222 172.9,47.325 173.18,47.605 T1.3@173.5,47.605
NetDA19_5: DA19.5 R112.1 | length 1.1
  Top Layer w0.2: R112.1@168.2,62.2 168.318,62.318 DA19.5@169.231,62.318
NetDA19_8: DA19.8 R111.1 | length 1
  Top Layer w0.2: R111.1@168.225,60.8 168.243,60.818 DA19.8@169.231,60.818
NetDA19_13: DA19.13 DA19.14 T2.1 | length 2.3
  Top Layer w0.2: DA19.14@172.031,61.318 DA19.13@172.031,60.818 172.756,60.818 172.873,60.701 172.873,60.474 173.153,60.194 T2.1@173.445,60.194
NetDA19_15: DA19.15 DA19.16 T2.3 | length 2.1
  Top Layer w0.2: DA19.15@172.031,61.818 DA19.16@172.031,62.318 172.749,62.318 173.125,62.694 T2.3@173.445,62.694
NetDD1_A12: DD1.A12 X2.1 | length 2.5
  Top Layer w0.125: DD1.A12@127.412,37.425 127.412,37.459 127.8,37.847 127.8,38.028 X2.1@129.048,39.276
NetDD1_A13: DD1.A13 X1.1 | length 3.4
  Top Layer w0.125: DD1.A13@128.212,37.425 128.212,37.941 128.521,38.25 129.557,38.25 X1.1@130.565,39.259
NetDD1_AA7: DD1.AA7 R60.2 | length 79
  Top Layer w0.125: R60.2@48.964,29.464 49.562,29.464 49.651,29.375 v2(49.725,29.375) ; v2(116.05,21.9) 116.073,21.9 116.261,21.713 116.674,21.713 118.361,20.025 119.639,20.025 119.814,20.2 v2(119.85,20.2)
  Top Layer w0.2: v2(123.011,21.024) DD1.AA7@123.412,21.425
  Layer 1 w0.125: v2(49.725,29.375) 53.207,29.375 53.232,29.4 77.82,29.4 79.82,27.4 102.095,27.4 104.683,24.813 112.283,24.813 115.195,21.9 v2(116.05,21.9) ; v2(119.85,20.2) 120.275,20.625 122.612,20.625 v2(123.011,21.024)
NetDD1_AB5: DD1.AB5 R65.2 | length 77.3
  Top Layer w0.125: R65.2@48.964,28.575 49.625,28.575 v2(49.65,28.55) ; v2(115.625,21.537) 115.675,21.488 116.581,21.488 118.268,19.8 120.987,19.8 DD1.AB5@121.812,20.625
  Layer 1 w0.125: v2(49.65,28.55) 52.7,28.55 53.325,29.175 77.727,29.175 79.727,27.175 102.002,27.175 104.589,24.588 112.189,24.588 115.238,21.54 115.623,21.54 v2(115.625,21.537)
NetDD1_AB6: DD1.AB6 R66.1 | length 78.5
  Top Layer w0.125: R66.1@48.964,27.686 49.739,27.686 v2(49.775,27.65) ; v2(116.125,21.125) 116.625,21.125 118.175,19.575 121.562,19.575 DD1.AB6@122.612,20.625
  Layer 1 w0.125: v2(49.775,27.65) 52.118,27.65 53.418,28.95 77.634,28.95 79.634,26.95 101.909,26.95 104.496,24.363 112.096,24.363 115.284,21.175 115.822,21.175 115.849,21.147 116.103,21.147 v2(116.125,21.125)
NetDD1_AB7: DD1.AB7 R67.1 | length 79.7
  Top Layer w0.125: R67.1@48.964,26.797 49.803,26.797 v2(49.825,26.775) ; v2(115.672,20.812) 115.722,20.762 116.628,20.762 118.041,19.35 122.137,19.35 DD1.AB7@123.412,20.625
  Layer 1 w0.125: v2(49.825,26.775) 51.561,26.775 53.511,28.725 77.541,28.725 79.541,26.725 101.816,26.725 104.403,24.138 112.003,24.138 115.284,20.857 115.628,20.857 v2(115.672,20.812)
NetDD1_AB9: DD1.AB9 R69.2 | length 82.1
  Top Layer w0.125: R69.2@48.964,25.019 49.073,25.128 49.378,25.128 50.15,25.9 v2(50.95,25.9) ; v2(115.675,20.087) 115.725,20.037 116.113,20.037 116.125,20.026 116.729,20.026 117.855,18.9 122.323,18.9 123.348,19.925 124.025,19.925 124.375,20.275 124.875,20.275 124.959,20.359 124.959,20.572 DD1.AB9@125.012,20.625
  Layer 1 w0.125: v2(50.95,25.9) 50.969,25.919 51.342,25.919 53.698,28.275 77.354,28.275 79.354,26.275 101.629,26.275 104.956,22.949 112.556,22.949 115.364,20.14 115.622,20.14 v2(115.675,20.087)
NetDD1_F7: DD1.F7 G1.3 | length 7.8
  Top Layer w0.125: G1.3@123.875,40.305 123.875,40.255 124.362,39.767 124.498,39.767 124.7,39.566 v2(124.7,39.525)
  Top Layer w0.2: DD1.F7@123.412,33.425 v2(123.775,33.788)
  Layer 2 w0.125: v2(123.775,33.788) 124.22,34.233 124.22,39.045 v2(124.7,39.525)
NetDD1_M7: DD1.M7 R47.1 | length 12.2
  Top Layer w0.125: v2(123.701,18.174) 124.199,18.174 R47.1@124.25,18.225
  Top Layer w0.2: DD1.M7@123.412,28.625 v2(123.813,28.224)
  Layer 2 w0.125: v2(123.701,18.174) 123.701,19.283 124.976,20.558 124.976,23.7 124.202,24.474 124.202,27.835 v2(123.813,28.224)
NetDD1_N7: DD1.N7 R48.1 | length 11
  Top Layer w0.125: R48.1@125.139,18.212 R48.1@125.139,18.225 v2(125.139,18.775)
  Top Layer w0.2: DD1.N7@123.412,27.825 123.45,27.825 123.776,27.499 v2(123.813,27.499)
  Layer 1 w0.125: v2(123.813,27.499) 124.286,27.027 124.299,27.027 125.012,26.313 125.012,24.625 125.937,23.7 125.937,19.573 v2(125.139,18.775)
NetDD1_T11: DD1.T11 R25.2 | length 1.2
  Top Layer w0.2: DD1.T11@126.612,25.425 v2(127.013,25.024)
  Bottom Layer w0.2: R25.2@127,25.625 127.013,25.612 v2(127.013,25.024)
NetDD1_T12: DD1.T12 HL1.1 R23.2 | length 31.5
  Top Layer w0.125: HL1.1@144.125,8.5 R23.2@144.125,10.2
  Top Layer w0.2: DD1.T12@127.412,25.425 v2(127.813,25.826)
  Layer 1 w0.125: v2(127.813,25.826) 127.443,25.456 127.443,23.943 126.591,23.091 126.591,18.534 130.75,14.375 139.625,14.375 144.09,9.91 144.09,9.558 v2(144.126,9.522)
NetDD1_T13: DD1.T13 R59.1 | length 16.5
  Top Layer w0.125: v2(133.3,17.1) R59.1@133.975,17.1
  Top Layer w0.2: DD1.T13@128.212,25.425 v2(128.613,25.826)
  Layer 1 w0.125: v2(128.613,25.826) 128.212,25.425 128.212,24.089 127.956,23.833 127.704,23.833 127.412,23.541 127.412,21.103 127.473,21.042 127.473,19.92 126.85,19.297 126.85,18.593 128.343,17.1 v2(133.3,17.1)
NetDD1_T14: DD1.T14 R24.2 | length 8
  Top Layer w0.125: R24.2@127.075,18.225 127.213,18.363 v2(127.213,18.899)
  Top Layer w0.2: v2(128.611,25.024) DD1.T14@129.012,25.425
  Layer 1 w0.125: v2(127.213,18.899) 127.213,19.342 128.322,20.452 128.322,23.732 128.558,23.967 128.558,24.971 v2(128.611,25.024)
NetDD1_T16: DD1.T16 X3.1 | length 10.9
  Top Layer w0.125: v2(129.9,19.5) 129.929,18.708 129.949,18.688 130.85,17.787 X3.1@130.85,17.55
  Top Layer w0.2: v2(130.211,25.024) DD1.T16@130.612,25.425
  Layer 2 w0.125: v2(129.9,19.5) 128.322,21.078 128.322,23.732 128.973,24.383 128.973,25.061 129.275,25.363 129.872,25.363 v2(130.211,25.024)
NetDD1_V14: DD1.V14 X4.1 | length 5.7
  Top Layer w0.125: DD1.V14@129.012,23.825 128.649,23.462 128.649,19.151 X4.1@129.3,18.5
NetDD1_Y11: DD1.Y11 R68.2 | length 84.5
  Top Layer w0.125: R68.2@48.964,25.908 49.783,25.908 50.275,26.4 v2(51.175,26.4) ; v2(116.143,20.4) 116.673,20.4 117.948,19.125 122.23,19.125 123.255,20.15 123.5,20.15 123.825,20.475 123.825,21.551 124.137,21.862 126.249,21.862 DD1.Y11@126.612,22.225
  Layer 1 w0.125: v2(51.175,26.4) 51.228,26.453 51.557,26.453 53.605,28.5 77.448,28.5 79.448,26.5 101.723,26.5 105.049,23.174 112.649,23.174 115.373,20.45 116.093,20.45 v2(116.143,20.4)
NetDD4_13: DD4.13 R41.2 R43.1 | length 2.8
  Top Layer w0.2: R41.2@30.734,45.408 30.803,45.477 R43.1@30.803,46.436 30.849,46.482 DD4.13@32.537,46.482
NetDD4_14: DD4.14 R40.1 R42.1 | length 9.8
  Top Layer w0.2: v2(30.275,49.269) 30.313,49.231 30.369,49.231 30.803,48.797 R42.1@30.803,47.325 ; DD4.14@32.537,45.212 34.013,45.212 v2(34.05,45.175)
  Layer 1 w0.2: v2(30.275,49.269) 30.275,48.225 33.325,45.175 v2(34.05,45.175)
NetDD5_3: DD5.3 R37.1 VD1.1 | length 2.8
  Top Layer w0.2: VD1.1@72.737,6.03 72.712,6.055 72.712,6.513 72.532,6.693 DD5.3@72.532,7.484 72.599,7.551 R37.1@73.787,7.551
NetDD6_L8: DD6.L8 R57.1 | length 1.5
  Top Layer w0.2: DD6.L8@107.497,32.066 v2(107.899,31.665)
  Bottom Layer w0.2: R57.1@107.15,32.2 107.647,31.703 107.86,31.703 v2(107.899,31.665)
NetDD7_41: DD7.41 R77.1 | length 6
  Top Layer w0.125: v3(43.434,31.877) 43.815,32.258 R77.1@44.381,32.258
  Top Layer w0.2: DD7.41@40.913,30.302 40.932,30.321 40.932,31.28 v4(41.021,31.369)
  Layer 1 w0.125: v4(41.021,31.369) 41.131,31.479 41.131,31.717 41.143,31.73 41.143,32.216 41.614,32.687 42.799,32.687 43.302,32.184 43.302,32.138 43.434,32.006 v3(43.434,31.877)
NetDD7_48: DD7.48 R80.1 | length 3.1
  Top Layer w0.2: R80.1@34.925,31.046 37.221,31.046 37.338,30.929 37.338,30.729 37.413,30.654 DD7.48@37.413,30.302 DD7.48@37.394,30.321
NetDD8_3: DD8.3 DD8.4 R161.1 | length 6.7
  Top Layer w0.25: R161.1@91.275,53.708 91.275,53.15 91.464,52.961 91.964,52.961 v4(92.05,52.875)
  Bottom Layer w0.25: v4(92.05,52.875) 92.136,52.961 92.136,53.425 92.419,53.708 93.75,53.708 94.25,54.208 ; DD8.4@95.075,54.183 95.056,54.202 94.256,54.202 94.25,54.208 ; DD8.3@95.075,54.833 95.056,54.814 94.396,54.814 94.25,54.667 94.25,54.208
NetDD10_8: DD10.8 R131.2 | length 9.9
  Top Layer w0.2: DD10.8@155.767,44.873 156.519,44.873 156.642,44.75 v3(156.75,44.75) ; R131.2@164.093,44.75 v3(164.093,45.565)
  Layer 3 w0.2: v3(156.75,44.75) 161.7,44.75 162.95,46 163.658,46 v3(164.093,45.565)
NetDD10_9: DD10.9 R132.2 | length 9.9
  Top Layer w0.2: DD10.9@155.767,45.373 156.465,45.373 156.617,45.525 v3(156.725,45.525) ; v3(164.1,47.135) R132.2@164.1,47.95
  Layer 3 w0.2: v3(156.725,45.525) 161.15,45.525 162.76,47.135 v3(164.1,47.135)
NetDD10_59: DD10.59 R135.1 | length 3.7
  Top Layer w0.125: R135.1@151.714,37.338 152.364,37.988 152.364,39.496 152.592,39.723 DD10.59@152.592,40.698
NetDD10_60: DD10.60 R135.2 | length 3.6
  Top Layer w0.125: R135.2@152.614,37.338 152.614,39.392 153.092,39.87 DD10.60@153.092,40.698
NetDD11_8: DD11.8 R133.2 | length 9.8
  Top Layer w0.125: DD11.8@155.974,60.762 157.388,60.762 158.017,60.133 v3(158.017,60.108)
  Top Layer w0.2: v3(163.9,60.75) 163.9,60.642 163.977,60.565 R133.2@163.977,59.872
  Layer 3 w0.125: v3(158.017,60.108) 160.408,60.108 161.525,61.225 163.425,61.225 v3(163.9,60.75)
NetDD11_9: DD11.9 R134.2 | length 9.5
  Top Layer w0.125: DD11.9@155.974,61.262 157.577,61.262 158.006,60.833 v3(158.017,60.833)
  Top Layer w0.2: v3(163.908,62.233) R134.2@163.908,63.047
  Layer 3 w0.125: v3(158.017,60.833) 159.883,60.833 161.283,62.233 v3(163.908,62.233)
NetDD11_59: DD11.59 R136.1 | length 3.1
  Top Layer w0.125: R136.1@152.603,53.594 152.625,53.616 152.625,54.425 152.799,54.599 DD11.59@152.799,56.587
NetDD11_60: DD11.60 R136.2 | length 3.1
  Top Layer w0.125: DD11.60@153.299,56.587 153.299,54.276 153.503,54.072 R136.2@153.503,53.594
NetDD12_54: DD12.54 R146.1 | length 1.2
  Top Layer w0.2: DD12.54@167.21,7.434 167.21,6.602 R146.1@167.462,6.35
NetDD13_8: DD13.8 G3.6 | length 13.3
  Top Layer w0.2: G3.6@99.3,57.575 100.425,57.575 v2@100.9,58.05
  Layer 3 w0.2: v2(100.892,58.054) 109.079,58.054 v2(110.7,59.675)
  Bottom Layer w0.25: v2(110.7,59.675) DD13.8@110.7,60.65
NetDD13_19: DD13.19 R179.2 | length 1.2
  Bottom Layer w0.25: R179.2@111.175,65.325 111.2,65.3 DD13.19@111.2,64.15
NetDD14_7: DD14.7 R184.2 | length 1.8
  Top Layer w0.2: R184.2@73.664,17.961 73.664,17.261 73.925,17 DD14.7@73.925,16.3
NetDD14_8: DD14.8 R185.2 | length 1.9
  Top Layer w0.2: R185.2@72.775,17.961 72.797,17.939 72.797,17.478 73.425,16.85 DD14.8@73.425,16.3
NetDD14_9: DD14.9 R186.2 | length 2.3
  Top Layer w0.2: R186.2@71.447,16.968 71.479,17 71.934,17 72.395,16.539 72.395,16.03 72.537,15.888 72.537,15.673 72.56,15.65 DD14.9@72.775,15.65
NetDD14_10: DD14.10 R187.2 | length 2
  Top Layer w0.2: R187.2@71.447,16.079 71.544,15.982 71.985,15.982 72.103,15.865 72.103,15.372 72.315,15.16 72.765,15.16 DD14.10@72.775,15.15
NetDD14_11: DD14.11 R188.2 | length 1.6
  Top Layer w0.2: R188.2@71.447,15.19 71.647,14.99 71.71,14.99 72.05,14.65 DD14.11@72.775,14.65
NetDD14_23: DD14.23 XP6.2 | length 20.6
  Top Layer w0.2: v3(76.218,10.6) 76.218,10.708 76.415,10.906 76.415,11.49 DD14.23@76.425,11.5
  Layer 3 w0.2: v3(76.218,10.6) 79.718,7.1 86.776,7.1 89.951,3.925 XP6.2@93.075,3.925
NetDD14_25: DD14.25 XP6.1 | length 20
  Top Layer w0.2: DD14.25@77.575,12.15 78.246,12.15 78.363,12.033 v3(78.363,11.38)
  Layer 3 w0.2: v3(78.363,11.38) 78.363,11.301 78.125,11.063 78.125,9.4 80.125,7.4 86.9,7.4 88.375,5.925 XP6.1@93.075,5.925
NetDD16_40: DD16.40 R10.1 R155.1 | length 2.9
  Top Layer w0.2: R155.1@50.65,12.15 R10.1@50.65,11.175 51.25,10.575 DD16.40@52.325,10.575
NetDD17_11: DD17.11 R163.1 | length 1.3
  Top Layer w0.125: DD17.11@44.4,13.875 44.42,13.895 44.77,13.895 45.111,14.236 45.361,14.236 R163.1@45.525,14.4
NetDD17_13: DD17.13 R167.2 | length 1.2
  Top Layer w0.125: DD17.13@43.75,15.025 43.75,16.025 R167.2@43.925,16.2
NetDD17_14: DD17.14 R166.2 | length 1.3
  Top Layer w0.125: R166.2@42.95,16.2 43.25,15.9 DD17.14@43.25,15.025
NetDD17_17: DD17.17 R165.1 | length 1.2
  Top Layer w0.125: R165.1@41.525,16.175 41.75,15.95 DD17.17@41.75,15.025
NetDD17_24: DD17.24 R164.2 | length 1.4
  Top Layer w0.125: v2(39.95,11.875) DD17.24@40.6,11.875
  Bottom Layer w0.2: v2(39.95,11.875) 40.673,11.875 R164.2@40.693,11.855
NetDD18_6: DD18.6 R203.2 | length 1.6
  Top Layer w0.25: R203.2@63.625,38 63.9,37.725 DD18.6@65.15,37.725
NetDD18_14: DD18.14 R201.1 | length 4.3
  Top Layer w0.25: R201.1@61.575,33.15 62.125,32.6 63.2,32.6 64.325,33.725 DD18.14@65.15,33.725
NetDD18_21: DD18.21 R206.2 | length 10.8
  Top Layer w0.125: v2(77.558,30.703) 78.222,30.703 R206.2@78.225,30.7
  Top Layer w0.2: DD18.21@69.15,30.725 v2@69.15,31.925
  Layer 1 w0.125: v2(69.165,31.94) 70.403,30.703 v2(77.558,30.703)
NetDD18_59: DD18.59 R204.2 R205.1 | length 49.7
  Top Layer w0.125: R204.2@43.275,7.875 v2(43.975,7.875)
  Top Layer w0.2: R205.1@43.275,6.85 R204.2@43.275,7.875
  Top Layer w0.25: v2(69.65,40.9) DD18.59@69.65,42.225
  Layer 2 w0.125: v2(43.975,7.875) 45.663,7.875 48.175,10.387 48.175,11.65 49.025,12.5 52.375,12.5 60.975,21.1 60.975,27.197 65.15,31.372 65.15,36.4 v2(69.65,40.9)
NetL14_2: L14.2 R42.2 R46.1 | length 4.7
  Top Layer w0.2: L14.2@26.96,45.358 27.683,45.358 27.9,45.575 27.9,47.125 28.169,47.394 R46.1@28.956,47.394 29.834,47.394 R42.2@29.903,47.325
NetL14_3: L14.3 R43.2 R46.2 | length 4.4
  Top Layer w0.2: L14.3@26.96,44.558 27.633,44.558 28.3,45.225 28.3,46.3 28.473,46.473 28.935,46.473 R46.2@28.956,46.494 29.845,46.494 R43.2@29.903,46.436
NetL58_1: L58.1 XP1.1 | length 2.1
  Top Layer w1: v4@37.282,58.134 v4@37.282,60.157 ; L58.1@37.75,57.1 L58.1@37.75,57.225
  other v4: 38.25,58.123 37.062,58.134 38.25,59.261 37.062,59.272 37.062,60.411 38.25,60.4 37.062,61.55 38.25,61.539 37.062,62.688 38.25,62.677 37.062,63.836 38.25,63.825
NetR12_1: R12.1 R196.1 XP7.2 | length 53.4
  Layer 1 w0.125: v2(95.93,41.125) 96.58,41.125 96.68,41.225 104.258,41.225 108.508,45.475 113.2,45.475 v2@114.025,46.3
  Layer 4 w0.2: XP7.2@92.9,10.85 95.93,13.88 v2(95.93,41.125)
  Bottom Layer w0.125: v2(114.015,46.311) 114.636,46.311 R196.1@114.675,46.35
  Bottom Layer w0.2: R12.1@114.675,45.4 R196.1@114.675,46.35
NetR38_2: R38.2 VU1.1 | length 3.8
  Top Layer w0.2: R38.2@29.972,38.365 31.015,38.365 31.35,38.7 31.35,39.575 31.174,39.751 VU1.1@29.999,39.751
NetR39_2: R39.2 VU2.1 | length 2
  Top Layer w0.4: VU2.1@29.872,53.213 31.681,53.213 R39.2@31.808,53.34
NetR152_1: R152.1 R153.1 T3.1 | length 2.3
  Top Layer w0.3: R153.1@178.014,18.669 R152.1@178.014,17.78 178.141,17.907 T3.1@179.358,17.907
NetR154_1: R154.1 R157.1 T3.3 | length 2.3
  Top Layer w0.3: R157.1@178.014,19.685 R154.1@178.014,20.574 178.181,20.407 T3.3@179.358,20.407
NetR169_2: R169.2 VU3.1 | length 2.1
  Top Layer w0.2: R169.2@32.15,6.475 32.15,5.75 32.315,5.585 VU3.1@33.45,5.585
NetR175_1: R175.1 R176.2 | length 1.4
  Top Layer w0.125: R175.1@32.089,7.5 R176.2@33.475,7.5
NetR176_1: R176.1 R177.2 | length 1.4
  Top Layer w0.125: R176.1@34.375,7.5 R177.2@35.761,7.5
OUT_422A: L14.1 XS3.11 | length 19.8
  Top Layer w0.2: v2(23.625,45.475) 23.679,45.475 23.796,45.358 L14.1@25.11,45.358
  Layer 2 w0.2: XS3.11@8.263,49.625 8.263,47.612 10.4,45.475 v2(23.625,45.475)
OUT_422B: L14.4 XS3.12 | length 24.6
  Top Layer w0.2: v2(23.65,44.525) 23.683,44.558 L14.4@25.11,44.558
  Layer 2 w0.2: XS3.12@8.263,51.915 6.625,50.277 6.625,47.95 10.05,44.525 v2(23.65,44.525)
OUT_422Y: DD4.11 XS3.14 | length 30.9
  Top Layer w0.2: DD4.11@32.537,49.022 33.897,49.022 v2(33.9,49.025)
  Layer 1 w0.2: XS3.14@8.273,56.485 11.797,56.485 12.977,55.305 13.799,55.305 20.079,49.025 25.151,49.025 26.095,49.969 32.563,49.969 33.508,49.025 v2(33.9,49.025)
OUT_422Z: DD4.12 XS3.13 | length 30.8
  Top Layer w0.2: DD4.12@32.537,47.752 32.564,47.725 v2(33.925,47.725)
  Layer 1 w0.2: XS3.13@8.263,54.205 8.308,54.16 11.832,54.16 12.887,53.105 13.745,53.105 18.125,48.725 25.275,48.725 26.219,49.669 32.421,49.669 33.925,48.165 v2(33.925,47.725)
OUT_GND: A1.3 C82.1 C83.1 DD4.9 DD4.10 DD4.15 R41.1 XS3.3 XS3.15 | length 54.6
  Top Layer w0.2: C82.1@29.337,44.172 29.487,44.172 29.887,43.772 29.887,43.622 30.044,43.465 C83.1@30.734,43.465 31.211,43.942 ; R41.1@30.734,44.508 31.211,44.031 31.211,43.942 ; DD4.10@32.537,50.292 32.545,50.3 34.633,50.3 ; DD4.9@32.537,51.562 34.363,51.562 34.633,51.292 34.633,43.942 ; A1.3@35.687,40.132 35.687,42.888 34.633,43.942 ; 31.211,43.942 DD4.15@32.537,43.942 34.633,43.942
  Top Layer w0.4: v3@30.003,50.981 30.584,51.562 DD4.9@32.537,51.562
  Layer 2 w0.4: XS3.15@8.263,58.785 8.496,59.018 11.344,59.018 12.104,58.258 12.104,55.444 XS3.3@13.343,54.205 19.598,47.95 26.975,47.95 v3@30,50.975
  other v3: 29.994,50.981
OUT_RS422_RX: DD1.G7 DD4.3 | length 99.8
  Top Layer w0.2: DD4.3@42.037,45.212 v4(43.561,45.212) ; v2(123.012,33.028) v2(123.012,33.028) 123.412,32.626 DD1.G7@123.412,32.625
  Layer 1 w0.125: v4@43.574,45.212 56.757,45.212 66.119,35.85 66.119,35.035 67.215,33.94 70.546,33.94 71.431,34.825 71.431,35.295 76.436,40.3 95.088,40.3 95.3,40.087 96.862,40.087 96.969,40.194 104.5,40.194 108.854,44.548 117.047,44.548 119.35,42.245 119.35,41.825 119.619,41.556 119.619,38.774 121.2,37.193 121.2,36.463 121.813,35.85 122.225,35.85 122.613,35.462 122.613,33.426 v2(123.012,33.028)
OUT_RS422_TX: DD1.B4 DD4.6 | length 97.7
  Top Layer w0.125: DD4.6@42.037,49.022 DD4.6@42.076,49.061 ; v2(119.553,43.2) 119.557,43.197 119.557,42.905 119.938,42.524 120.007,42.524 120.238,42.294 120.238,41.531 120.117,41.411 120.117,38.958 121.4,37.675 121.4,37.013 DD1.B4@121.012,36.625
  Top Layer w0.2: DD4.6@42.076,49.061 42.101,49.036 v4@43.886,49.036
  Layer 1 w0.125: v4(43.9,49.05) 53.237,49.05 66.344,35.943 66.344,35.129 67.308,34.165 70.452,34.165 71.206,34.919 71.206,35.388 76.843,41.025 80.632,41.025 80.907,40.75 95.274,40.75 95.487,40.537 96.629,40.537 96.841,40.75 104.419,40.75 108.667,44.998 117.27,44.998 119.068,43.2 v2(119.553,43.2)
PG_1V5: DA2.4 DA5.4 DA6.7 DA7.4 DA10.4 R2.1 | length 59.7
  Top Layer w0.125: DA6.7@61.52,65.797 62.422,65.797 v2(62.425,65.8) ; v2(68.707,57.425) 68.707,57.875 68.958,58.126 DA2.4@70,58.126 ; DA7.4@79.905,57.733 79.935,57.763 80.463,57.763 v2(81.025,58.325)
  Top Layer w0.3: DA5.4@59.308,57.499 59.318,57.509 59.866,57.509 60.132,57.775 v2(60.132,58.2) 60.907,58.2 61.032,58.325 R2.1@61.032,58.375 ; v2(96.725,45.387) 96.744,45.407 96.864,45.407 97.373,45.916 DA10.4@97.698,45.916
  Layer 2 w0.125: v2(68.707,57.425) 74.519,57.425 75.544,58.45 80.493,58.45 80.618,58.325 v2(81.025,58.325) 81.7,59 84.5,59 95.65,47.85 95.65,46.8 96.675,45.775 96.675,45.437 v2(96.725,45.387)
  Layer 4 w0.125: v2(60.132,58.2) 60.645,58.713 65.289,58.713 66.576,57.425 v2(68.707,57.425) ; 61.438,58.75 61.438,64.812 v2(62.425,65.8)
PG_5V0: DA1.8 DA2.7 DA5.7 DA7.7 DA10.7 R191.2 | length 67.9
  Top Layer w0.125: DA1.8@49.57,64.2 49.594,64.176 50.073,64.176 50.349,63.9 50.539,63.9 50.714,63.725 v2(50.75,63.725)
  Top Layer w0.2: DA5.7@56.608,56.199 57.312,56.199 57.503,56.39 57.503,56.803 57.863,57.162 v2(57.863,57.17) 57.863,58.812 R191.2@57.8,58.875 ; DA2.7@67.3,56.826 67.307,56.819 68.25,56.819 v2(68.257,56.813) ; v2(81.619,58.406) 81.656,58.444 81.656,58.906 81.783,59.033 DA7.7@82.605,59.033 ; v2(94.291,44.616) DA10.7@94.998,44.616
  Layer 2 w0.125: v2(68.257,56.813) 68.706,56.364 69.164,56.364 69.9,57.1 74.513,57.1 75.638,58.225 80.4,58.225 80.663,57.962 81.175,57.962 v2(81.619,58.406) ; v2@81.6,58.406 81.619,58.425 84.757,58.425 95.425,47.757 95.425,45.75 v2(94.291,44.616)
  Layer 4 w0.125: v2(50.75,63.725) 51.25,63.725 51.727,63.249 56.576,63.249 57.863,61.962 v2(57.863,57.17) 58.195,56.838 63.175,56.838 63.225,56.787 68.232,56.787 v2(68.257,56.813)
PG_ALL: C67.2 DA6.4 DD1.B5 R28.1 | length 88.9
  Top Layer w0.125: C67.2@60.252,67.812 62.338,67.812 63.053,67.097 DA6.4@64.22,67.097 64.847,67.097 65.175,67.425 65.175,68.225 65.038,68.362 R28.1@64.492,68.362 ; v2(120,42.975) 120,42.901 120.137,42.763 120.137,42.712 120.637,42.212 120.637,42.084 121.397,41.325 121.935,41.325 122.375,40.885 122.375,38 122.2,37.825 122.2,37.013 DD1.B5@121.812,36.625
  Layer 1 w0.125: v2(81.575,45.825) 81.628,45.878 81.628,46.184 81.868,46.425 97.75,46.425 98.513,45.662 100.125,45.662 100.951,46.488 103.349,46.488 104.562,47.702 118.014,47.702 119.687,46.028 119.687,46.017 120.25,45.455 120.25,43.273 120,43.023 v2(120,42.975)
  Layer 2 w0.125: v2(65.178,67.428) 67.45,65.156 67.45,56.575 78.2,45.825 v2(81.575,45.825)
PG_ETH0: DA11.4 R62.1 R70.2 | length 2.8
  Top Layer w0.3: DA11.4@55.458,24.616 55.468,24.606 55.468,24.191 55.659,24 56.769,24 ; R70.2@56.612,24.158 56.711,24.058 R62.1@56.711,23.241
PS_SRST_B: DD1.C9 R27.1 R206.1 | length 62.2
  Top Layer w0.125: R206.1@79.125,30.7 79.338,30.913 79.527,30.913 79.6,30.987 79.6,31.289 79.375,31.514 v2(79.375,31.525)
  Top Layer w0.2: v2(124.611,36.226) DD1.C9@125.012,35.825
  Layer 1 w0.125: v2(80.402,40.663) 80.454,40.61 80.729,40.61 80.814,40.525 95.181,40.525 95.394,40.312 96.722,40.312 96.934,40.525 104.513,40.525 108.761,44.773 117.175,44.773 119.451,42.497 120.225,42.497 120.978,41.743 120.978,41.453 121.138,41.294 121.138,41.287 124.611,37.814 v2(124.611,36.226)
  Layer 2 w0.125: v2(79.375,31.525) 79.375,39.636 v2(80.402,40.663)
PTT: DD1.V9 DD5.6 | length 65.7
  Top Layer w0.125: DD5.6@71.232,9.534 71.232,10.182 v2(71.25,10.2)
  Top Layer w0.2: DD1.V9@125.012,23.825 v2(125.413,23.424)
  Layer 1 w0.125: v2(71.25,10.2) 72.12,9.33 73.821,9.33 74.041,9.55 83.295,9.55 93.633,19.888 101.983,19.888 102.77,19.101 113.298,19.101 115.92,16.478 120.721,16.478 124.2,19.956 124.2,21.703 124.973,22.476 124.973,22.588 124.976,22.59 124.976,22.986 v2(125.413,23.424)
PTT_IN: C86.2 VD2.3 XP3.14 | length 44.9
  Top Layer w0.125: v3(69.925,4.175) 69.925,4.908 70.097,5.08 70.691,5.08 C86.2@71.12,4.651 ; XP3.14@106.261,6.034 v2@106.261,7.436
  Layer 1 w0.125: v3(69.925,4.175) 78.875,4.175 82.238,7.538 95.938,7.538 98.91,10.51 105.015,10.51 106.275,9.25 v2(106.275,7.45)
PTT_OUT_N: DA8.2 VU1.3 XS3.2 | length 16.6
  Top Layer w0.5: v2(21.55,42.525) 21.59,42.485 DA8.2@21.59,41.101 ; DA8.2@21.59,41.021 VU1.3@23.849,41.021
  Layer 1 w0.5: XS3.2@13.343,51.915 13.46,51.915 15.95,49.425 15.95,48.125 v2(21.55,42.525)
PTT_OUT_P: F1.1 XS3.1 | length 18.6
  Top Layer w0.5: v2(25.075,37) F1.1@25.075,38.1
  Layer 1 w0.5: XS3.1@13.343,49.625 14.8,48.168 14.8,47.275 v2(25.075,37)
PUDC_B: DD1.K16 R61.1 | length 13.1
  Top Layer w0.125: R61.1@128,18.225 128.039,18.264 128.039,18.639 128.3,18.9 v2(128.367,18.9)
  Top Layer w0.2: v2(130.211,29.824) DD1.K16@130.612,30.225
  Layer 1 w0.125: v2@128.374,18.906 128.374,20.185 128.572,20.383 128.572,23.447 129.825,24.7 129.825,29.438 v2(130.211,29.824)
PWR_EN: DA1.9 R182.2 R183.1 XP3.15 | length 118.6
  Top Layer w0.125: R183.1@44.1,53.725 R182.2@44.1,54.75 v2(44.875,54.75) ; DA1.9@49.57,64.7 49.609,64.661 49.959,64.661 50.37,64.25 v2(50.75,64.25) ; XP3.15@106.761,3.034 106.761,4.436 v2(106.775,4.45)
  Layer 3 w0.125: v2(61.475,23.275) 64.4,20.35 83.758,20.35 84.508,19.6 93.855,19.6 100.905,12.55 104.225,12.55 106.775,10 v2(106.775,4.45)
  Layer 4 w0.125: v2(44.875,54.75) 49.216,54.75 49.289,54.823 ; v2(50.75,64.25) 49.289,62.789 49.289,54.823 ; v2(61.475,23.275) 61.475,26.875 50.925,37.425 45.575,37.425 45.137,37.863 45.137,39.814 49.289,43.966 49.289,54.823